# Altium PCB LDCFullN.PcbDoc (part 1 of 2)
Units mm, origin at the board's own origin, x right, y up, seen from the top; angles counter-clockwise.
Board outline 42.47 x 36.98 mm, 4 copper layers (Top Layer, GND, Power, Bottom Layer), stack 1.579 mm thick; 85 components, 54 nets, 294 pads, 82 vias.
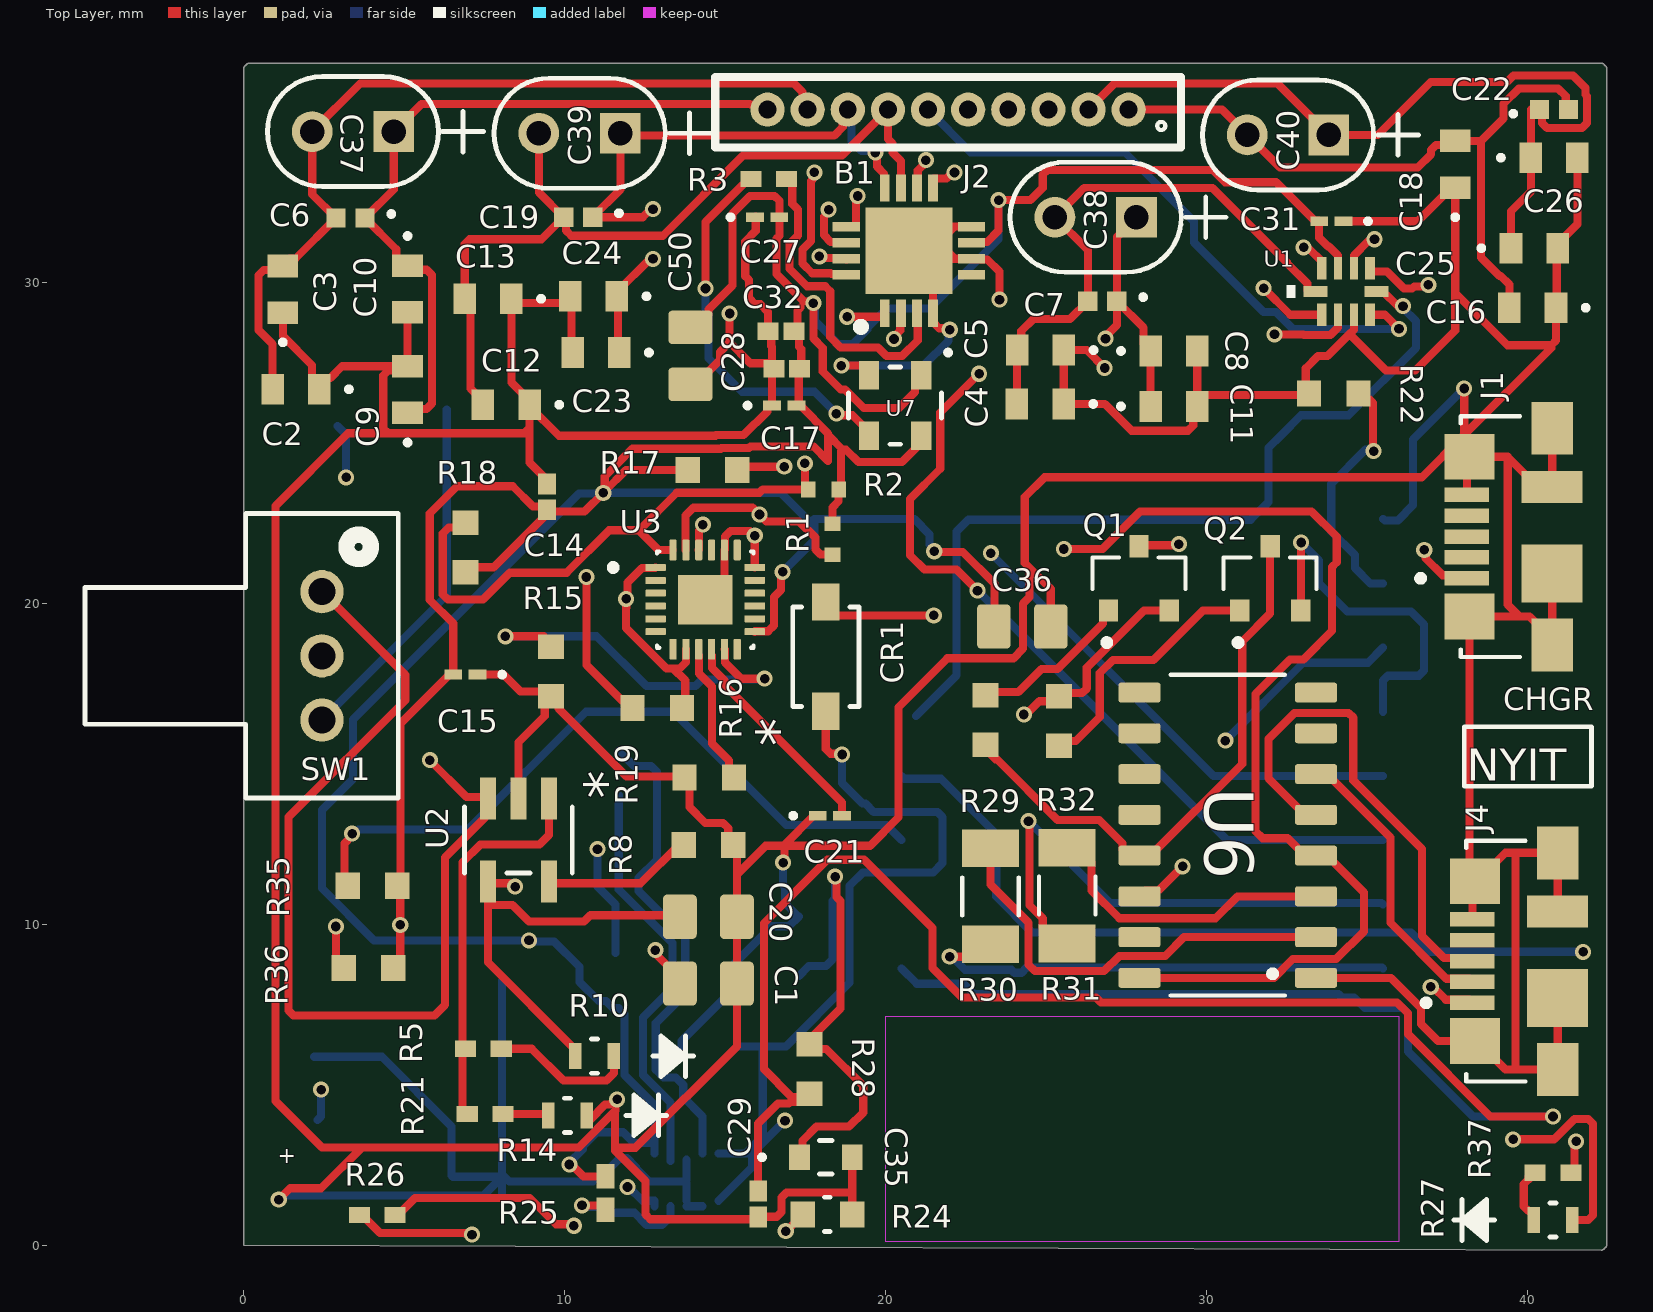
[diagram p0: Top Layer view]
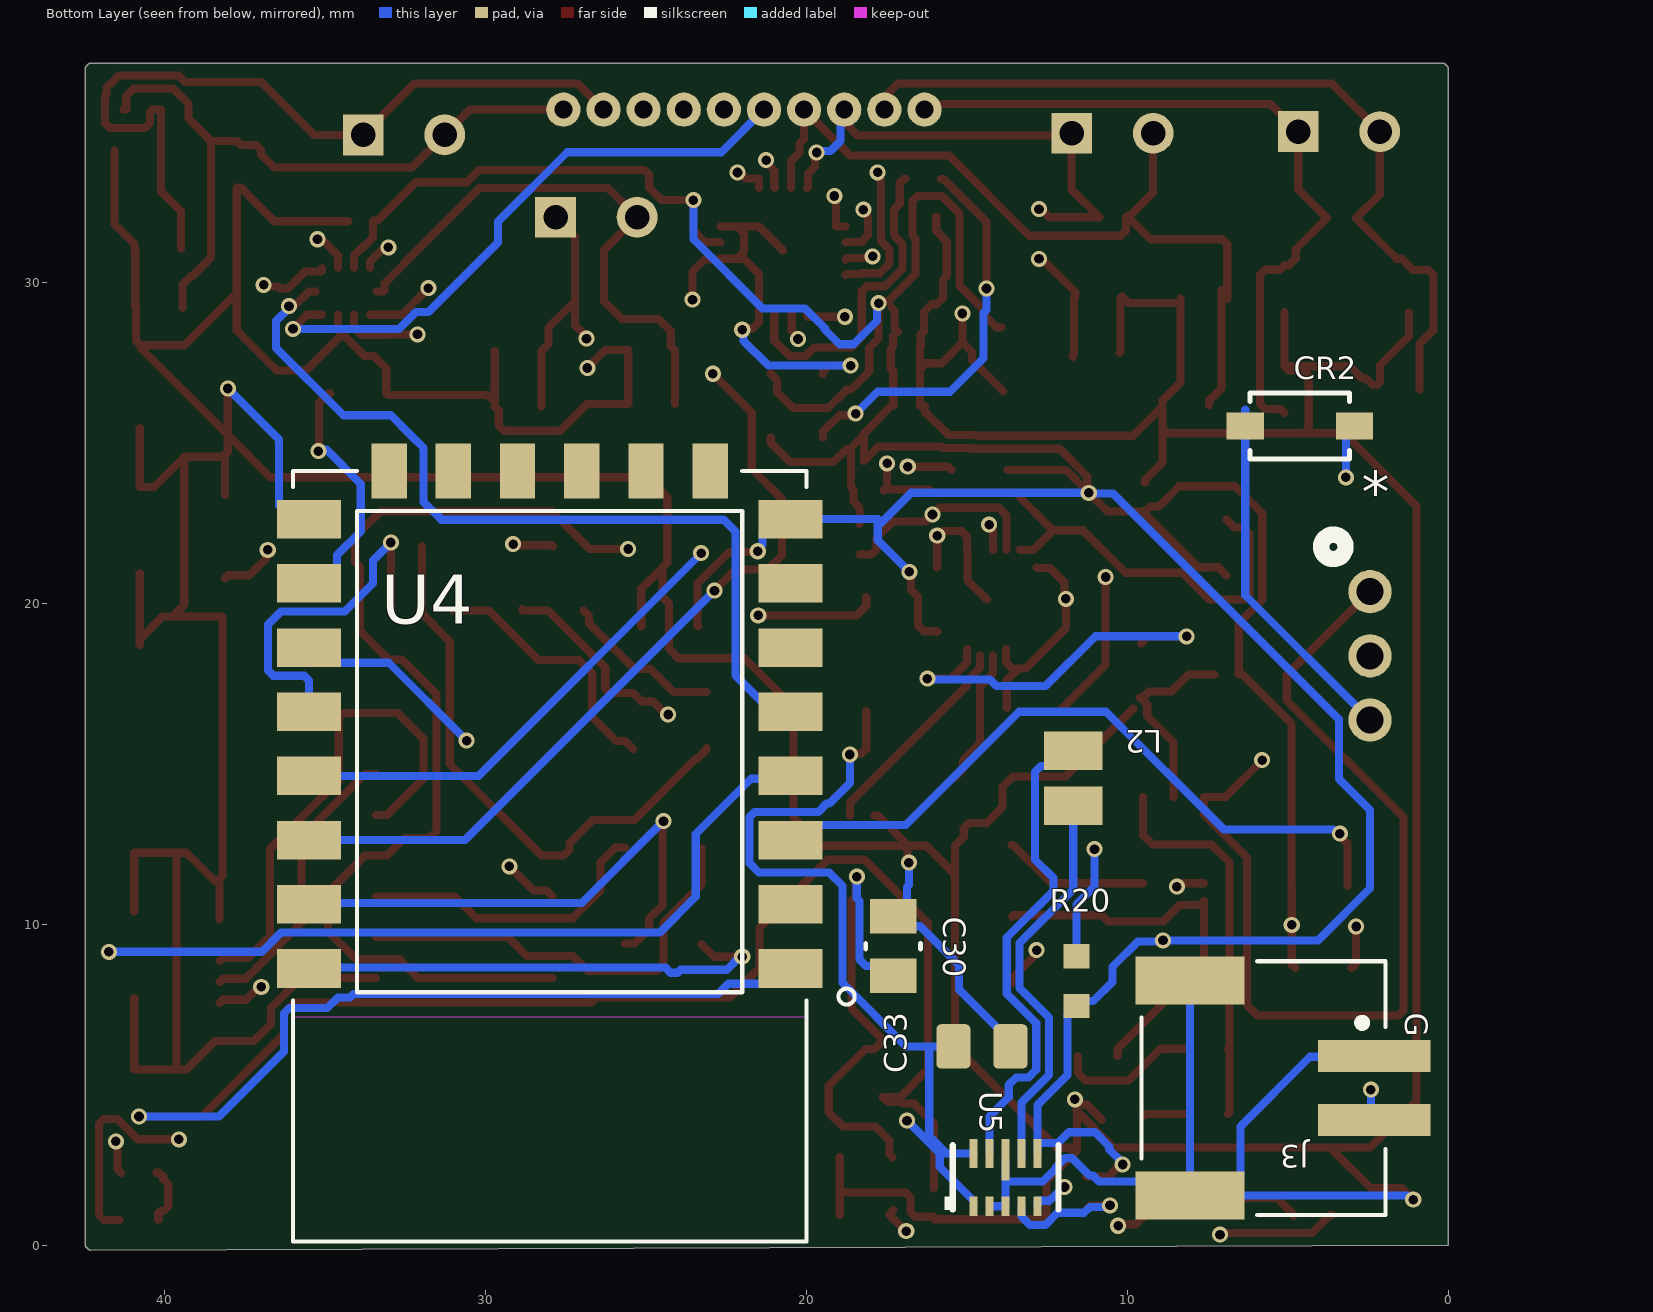
[diagram p1: Bottom Layer view, seen from below]
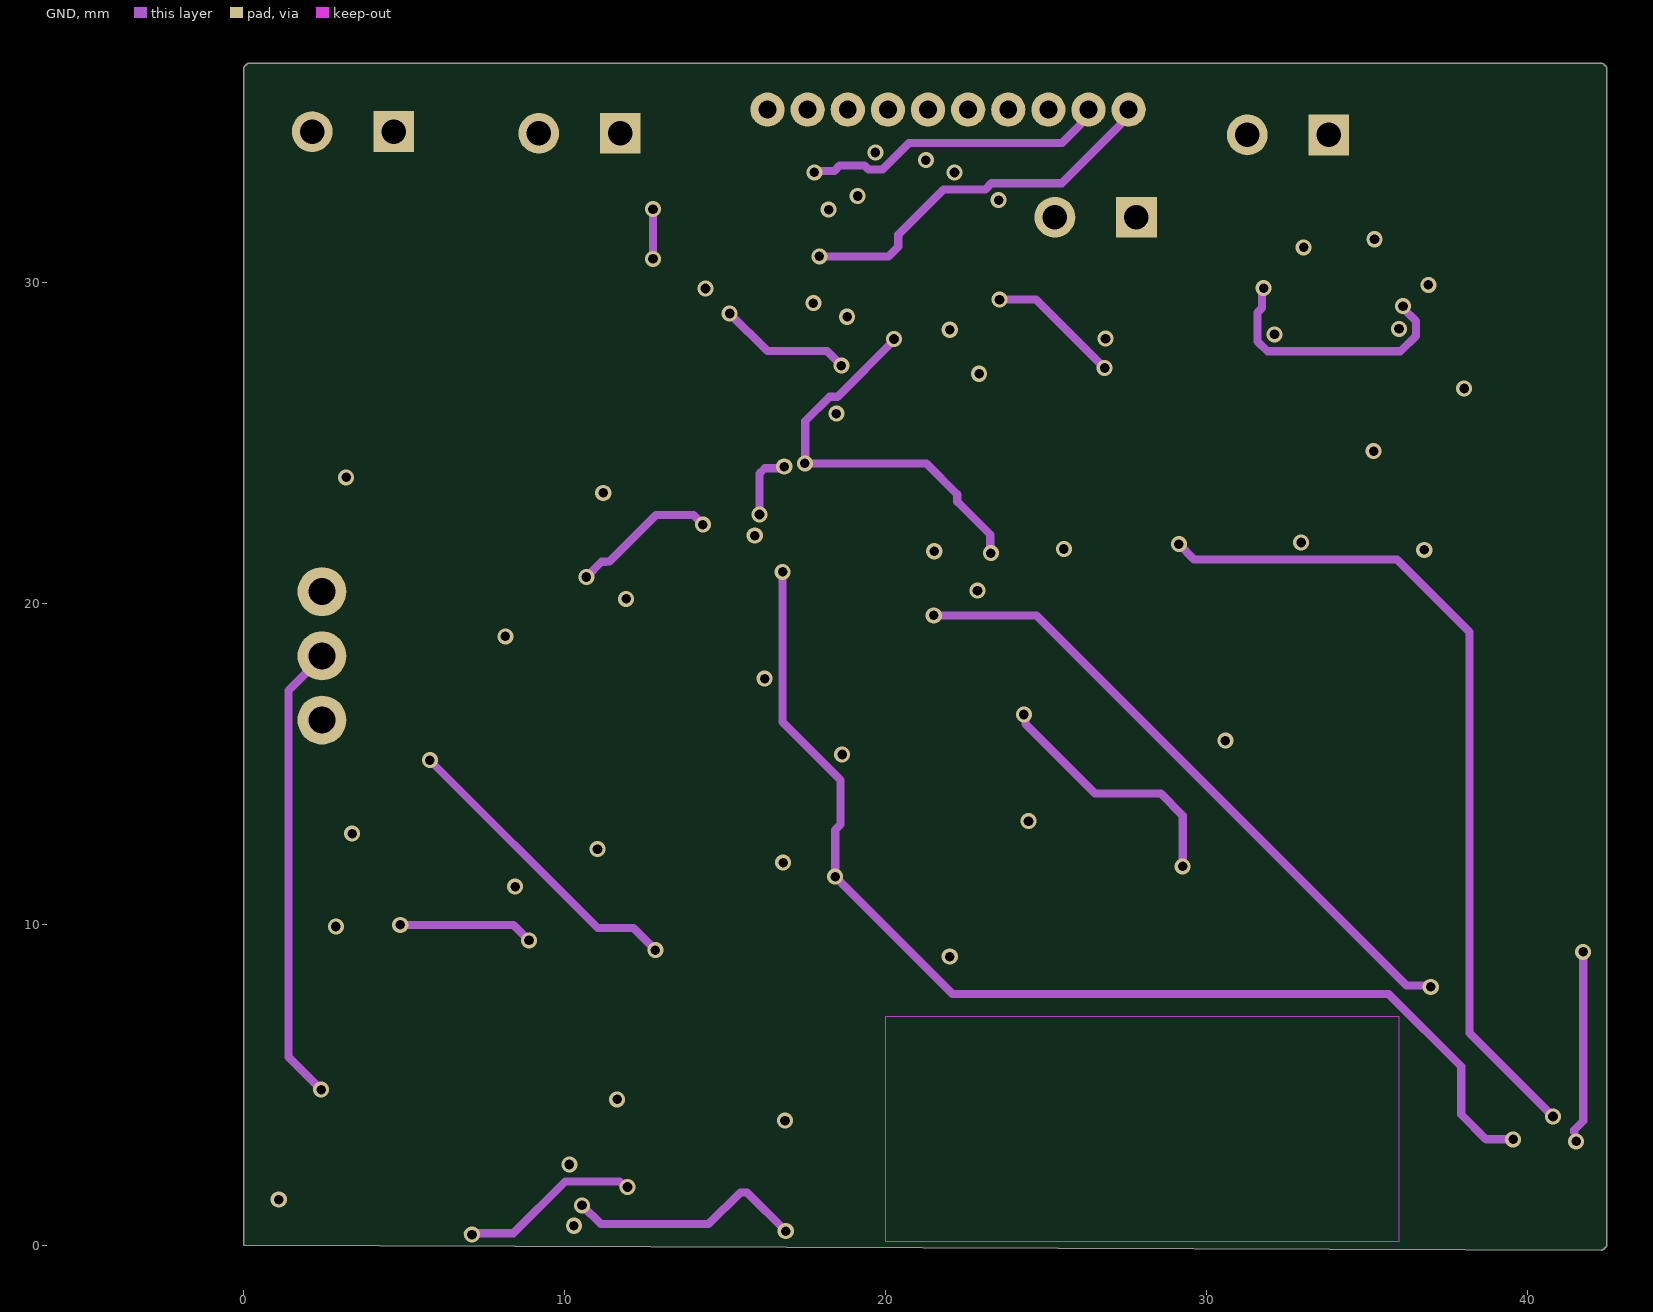
[diagram p2: GND]
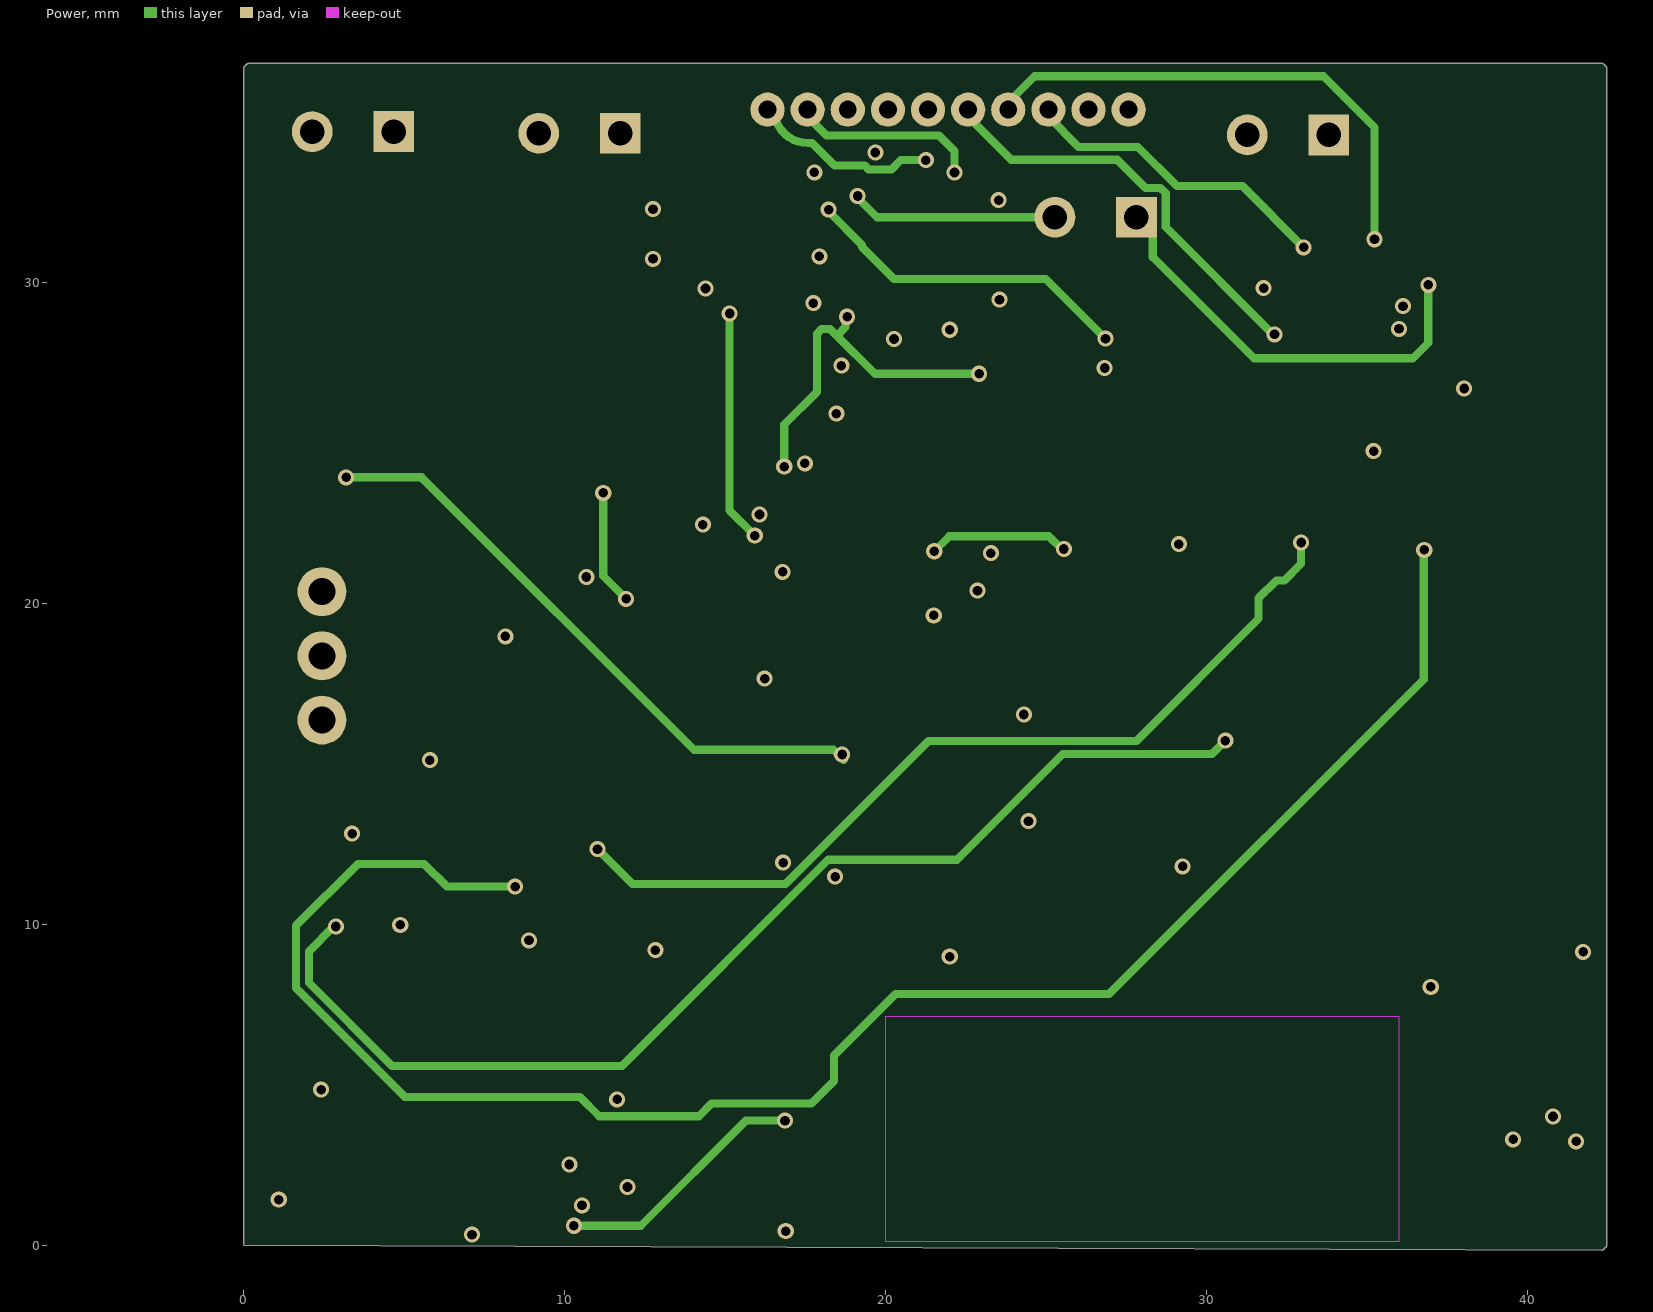
[diagram p3: Power]
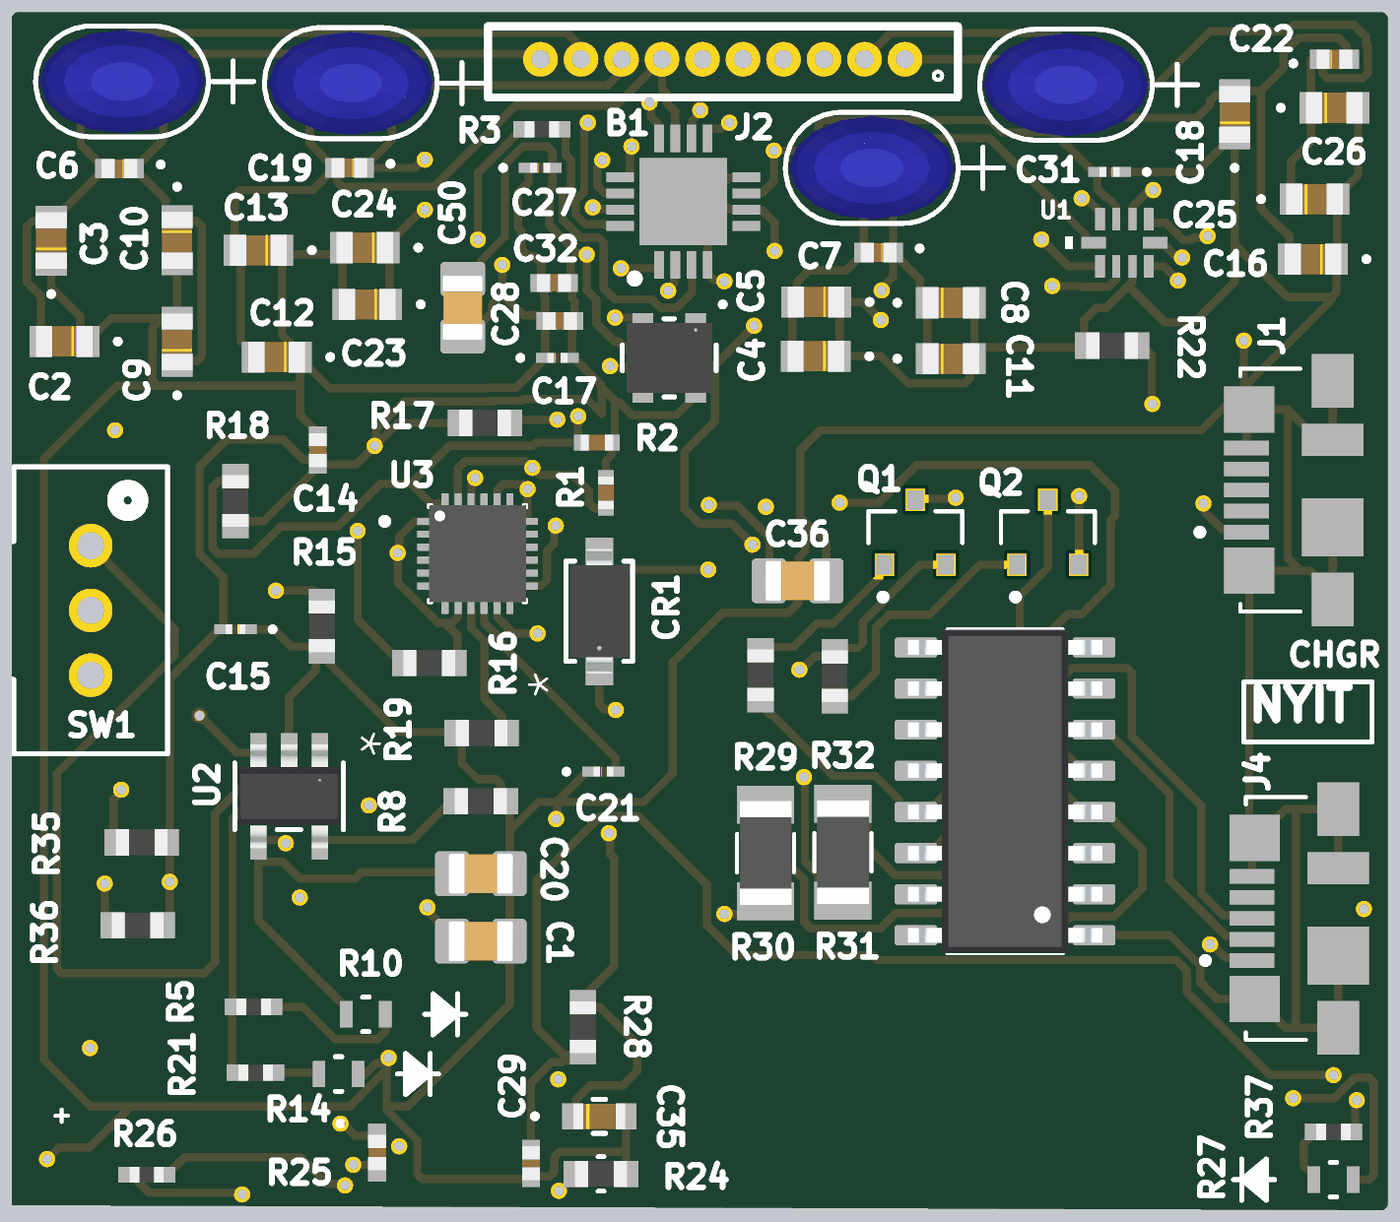
[diagram p5: 3D render of the assembled board from above, using the file's embedded part models]
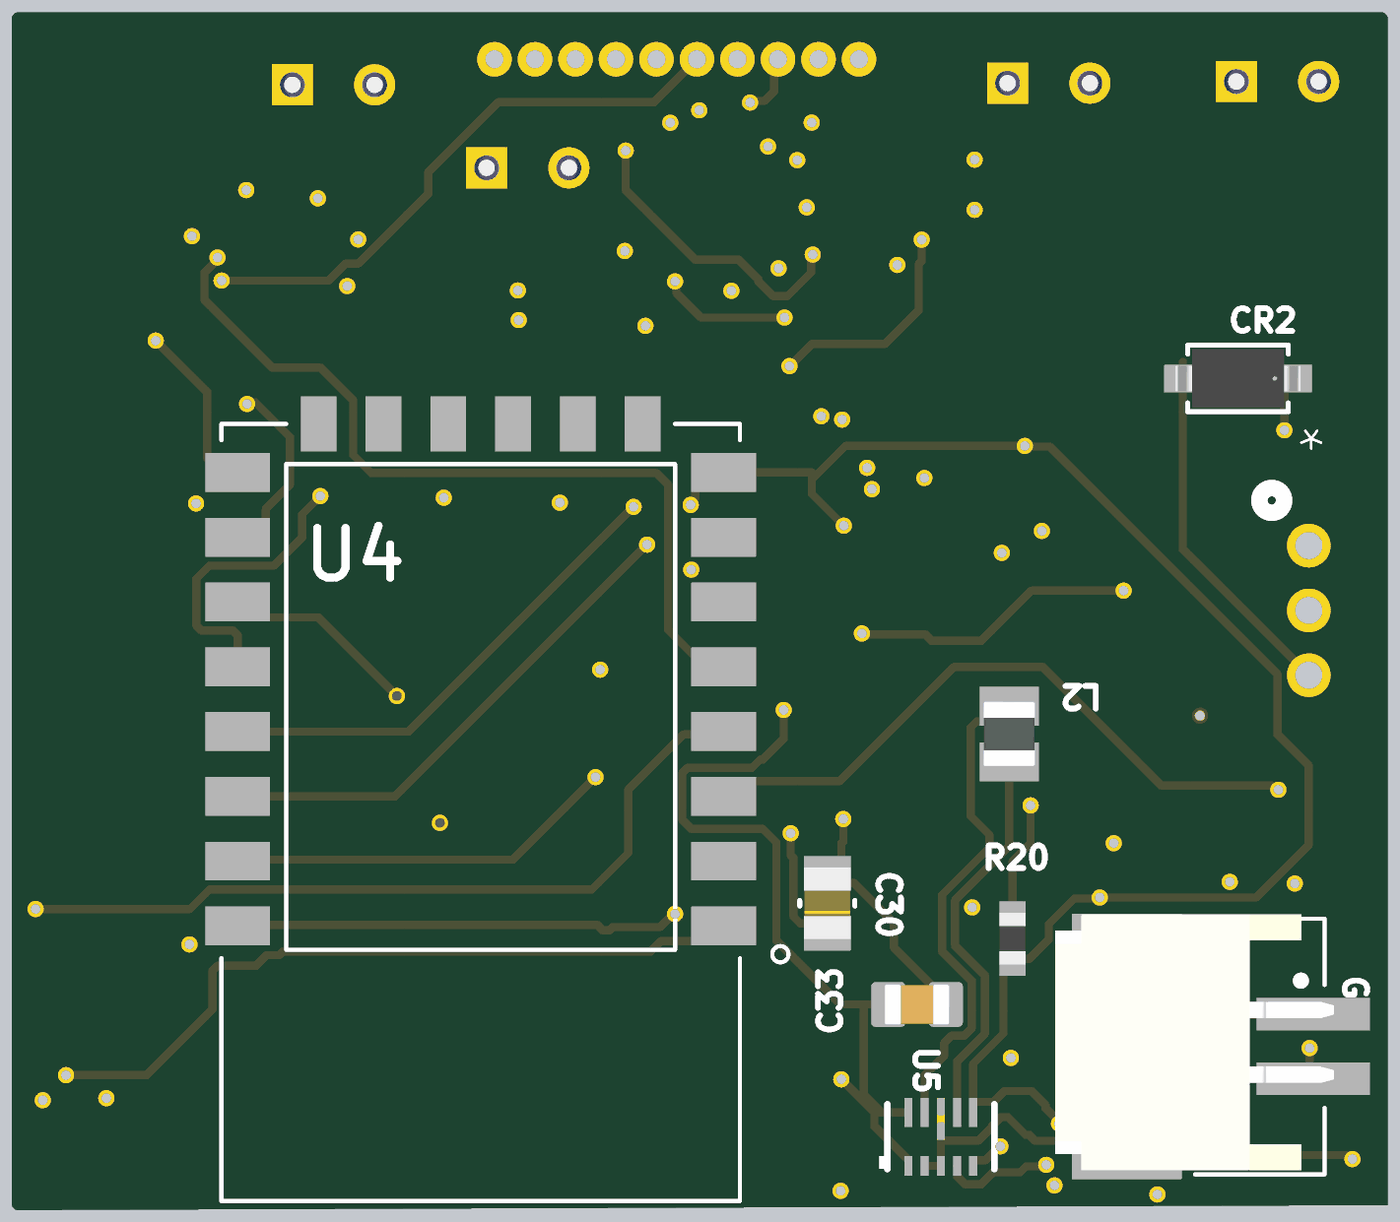
[diagram p6: 3D render of the assembled board from below, using the file's embedded part models]

## Layer stack, top to bottom
Top Solder: solder mask 0.0102, Solder Resist, Dk 3.5
Top Layer: signal copper 0.0356
Dielectric 2: prepreg 0.2, PP-006, Dk 4.1
GND: signal copper 0.035
Dielectric 1: dielectric 1.038, FR-4, Dk 4.8
Power: signal copper 0.035
Dielectric 3: prepreg 0.2, PP-006, Dk 4.1
Bottom Layer: signal copper 0.0356
Bottom Solder: solder mask 0.0102, Solder Resist, Dk 3.5

## Board outline
0,0 0,36.652 cw(c0.127,36.652) 0.066,36.764 cw(c0.178,36.703) 0.178,36.83 42.291,36.83 cw(c42.291,36.703) 42.403,36.764 cw(c42.342,36.652) 42.469,36.652 42.469,0.025 cw(c42.342,0.025) 42.403,-0.086 cw(c42.291,-0.025) 42.291,-0.153

## Design rules (kind name [scope] priority, off if disabled: settings)
BoardOutlineClearance [All] p1: gap=0.254 ignorepadtopadclearanceinfootprint=FALSE except(0: Arc-SplitContinuation Track-SplitContinuation SMDPad-SplitContinuation THPad-SplitContinuation Via-SplitContinuation Fill-SplitContinuation Poly-SplitContinuation Region-SplitContinuation Text-SplitContinuation)
Clearance [All] p1: gap=0.15 ignorepadtopadclearanceinfootprint=TRUE except(0.01: SMDPad-SMDPad)
MinimumSolderMaskSliver [All] p1: minsoldermaskwidth=0.1
PolygonConnect [All] p1: connectstyle=Relief reliefconductorwidth=0.254 reliefentries=4 polygonreliefangle="90 Angle" airgapwidth=0.254
RoutingVias [All] p1: holewidth=0.711 width=1.27 viastyle="Through Hole" minholewidth=0.711 minwidth=1.27 maxholewidth=0.711 maxwidth=1.27
SilkToSilkClearance [All] p1: silktosilkclearance=0.01
SilkToSolderMaskClearance [IsPad] p1: minsilkscreentomaskgap=0.15 clearancetoexposedcopper=TRUE
SolderMaskExpansion [All] p1: expansion=0 istentingtop=FALSE
SupplyNets "Schematic Supply Nets" [InNet('GND')] p1: voltage=0.000
Width [All] p1: maxlimit=0.254 minlimit=0.254 preferedwidth=0.254
27 further rules are at their usual default settings.

## Components (designator, comment, footprint, x,y, rotation, side; value= is the part's Value field where it differs from the comment)
B1 "LDC1614RGHT" "FileName=C:\Users\Zia\OneDrive - The Pennsylvania State University\Desktop\LDCLast\Altium\LDCAltium\QFN50P400X400X80-17N.PcbLib" 20.726,30.988 r90 top
C1 "CL21A106KPFNNNG" "FileName=C:\Users\Zia\OneDrive - The Pennsylvania State University\Desktop\LDCLast\AltiumLib\CL21A106KPFNNNG (10,100U)\CAPC2012X135N.PcbLib" 14.478,8.153 r180 top
C2 "06036A180JAT2A" CAP_06033D104JAT2A 1.626,26.67 r180 top
C3 "06036A180JAT2A" CAP_06033D104JAT2A 1.219,29.784 r90 top
C4 "06036A180JAT2A" CAP_06033D104JAT2A 24.816,26.213 r180 top
C5 "06036A180JAT2A" CAP_06033D104JAT2A 24.826,27.889 r180 top
C6 "0402ZC331KAT2A" CAP_04026Z104KAT2A 3.327,32.004 r180 top
C7 "0402ZC331KAT2A" CAP_04026Z104KAT2A 26.752,29.413 r180 top
C8 "06036A180JAT2A" CAP_06033D104JAT2A 28.981,27.864 r0 top
C9 "06036A180JAT2A" CAP_06033D104JAT2A 5.105,26.66 r90 top
C10 "06036A180JAT2A" CAP_06033D104JAT2A 5.105,29.794 r270 top
C11 "06036A180JAT2A" CAP_06033D104JAT2A 28.981,26.137 r0 top
C12 "06036A180JAT2A" CAP_06033D104JAT2A 8.179,26.187 r180 top
C13 "06036A180JAT2A" CAP_06033D104JAT2A 7.613,29.488 r180 top
C14 "C0402C103K8PACTU" CAPC10555_55N_KEM 9.449,23.317 r270 top
C15 "GRM033R60J104KE19D" G-033_MUR 6.909,17.78 r180 top
C16 "06036A180JAT2A" CAP_06033D104JAT2A 40.157,29.21 r180 top
C17 "GRM033R60J104KE19D" G-033_MUR 16.84,26.162 r0 top
C18 "06036A180JAT2A" CAP_06033D104JAT2A 37.744,33.68 r90 top
C19 "0402ZC331KAT2A" CAP_04026Z104KAT2A 10.42,32.029 r180 top
C20 "CL21A106KPFNNNG" "FileName=C:\Users\Zia\OneDrive - The Pennsylvania State University\Desktop\LDCLast\AltiumLib\CL21A106KPFNNNG (10,100U)\CAPC2012X135N.PcbLib" 14.478,10.236 r180 top
C21 "GRM033R60J104KE19D" G-033_MUR 18.263,13.386 r0 top
C22 "0402ZC331KAT2A" CAP_04026Z104KAT2A 40.823,35.382 r0 top
C23 "06036A180JAT2A" CAP_06033D104JAT2A 10.973,27.813 r180 top
C24 "06036A180JAT2A" CAP_06033D104JAT2A 10.897,29.566 r180 top
C25 "06036A180JAT2A" CAP_06033D104JAT2A 40.208,31.064 r0 top
C26 "06036A180JAT2A" CAP_06033D104JAT2A 40.818,33.884 r0 top
C27 "GRM033R60J104KE19D" G-033_MUR 16.31,32.029 r0 top
C28 "C0402C103K8PACTU" CAPC10555_55N_KEM 16.916,27.305 r0 top
C29 "C0402C471J5GACTU" CAPC10555_55N_KEM 16.027,1.289 r270 top
C30 "GRM21BR60J107ME15L" CAP_GRM21B_MUR 17.297,9.322 r90 bottom
C31 "GRM033R60J104KE19D" G-033_MUR 33.884,31.902 r180 top
C32 "C0402C105K9PACTU" CAPC10555_55N_KEM 16.739,28.473 r0 top
C33 "CL21A106KPFNNNG" "FileName=C:\Users\Zia\OneDrive - The Pennsylvania State University\Desktop\LDCLast\AltiumLib\CL21A106KPFNNNG (10,100U)\CAPC2012X135N.PcbLib" 14.529,6.198 r0 bottom
C35 "CL10A226MP8NUNE" CAP_CL10_SAM 18.136,2.743 r0 top
C36 "CL21A106KPFNNNG" "FileName=C:\Users\Zia\OneDrive - The Pennsylvania State University\Desktop\LDCLast\AltiumLib\CL21A106KPFNNNG (10,100U)\CAPC2012X135N.PcbLib" 24.257,19.279 r0 top
C37 "" FileName=AR205F473K4R:\PCBLib\0.pcblib 4.674,34.696 r180 top
C38 "AR205F473K4R" FileName=AR205F473K4R:\PCBLib\0.pcblib 27.813,32.029 r180 top
C39 "AR205F473K4R" FileName=AR205F473K4R:\PCBLib\0.pcblib 11.735,34.646 r180 top
C40 "AR205F473K4R" FileName=AR205F473K4R:\PCBLib\0.pcblib 33.807,34.595 r180 top
C50 "CL21A106KPFNNNG" CAPC2012X135N 13.919,27.711 r270 top
CR1 "B5819W-TP" SDO_SOD-123_MCC 18.136,18.339 r90 top
CR2 "B5819W-TP" SDO_SOD-123_MCC 4.623,25.527 r0 bottom
J1 "47346-0001" FileName=C:\Users\Public\Documents\Altium\AD26\Library\AltiumLib\USBMicro-47346-0001\MOLEX_47346-0001.PcbLib 40.767,22.08 r90 top
J2 "530481010" CONN10_530481010_MOL 27.57,35.382 r180 top
J3 "S2B-PH-SM4-TB(LF)(SN)" "FileName=C:\Users\Zia\OneDrive - The Pennsylvania State University\Desktop\LDCLast\Altium\S2B-PH-SM4-TB_LF__SN_2pin\JST_S2B-PH-SM4-TB(LF)(SN).PcbLib" 2.302,4.899 r270 bottom
J4 "47346-0001" FileName=C:\Users\Public\Documents\Altium\AD26\Library\AltiumLib\USBMicro-47346-0001\MOLEX_47346-0001.PcbLib 40.938,8.854 r90 top
L2 "DFE201612E-R47M=P2" INDC2016X120N 11.684,14.551 r90 bottom
Q1 "BC817-25" FileName=BC817-25:\PCBLib\0.pcblib 27.889,20.777 r90 top
Q2 "BC817-25" FileName=BC817-25:\PCBLib\0.pcblib 31.979,20.777 r90 top
R1 "RC0402JR-074K7L" RES_0402_YAG 18.339,21.996 r270 top
R2 "RC0402JR-074K7L" RES_0402_YAG 18.059,23.546 r180 top
R3 "RC0402JR-070RL" RC0402N_YAG#1 16.358,33.223 r0 top
R5 "RC0402FR-07470RL" RC0402N_YAG#2 7.468,6.121 r0 top
R8 "RC0603FR-0710KL" RC0603N_YAG#1 14.478,12.471 r180 top
R10 "SML-D12M8WT86" LED_SMLD12_ROM 10.928,5.893 r180 top
R14 "SML-D12M8WT86" LED_SMLD12_ROM 10.086,4.049 r180 top
R15 "RC0603FR-0710KL" RC0603N_YAG#1 9.576,17.873 r90 top
R16 "RC0603FR-0710KL" RC0603N_YAG#1 12.886,16.739 r180 top
R17 "RC0603FR-0710KL" RC0603N_YAG#1 14.605,24.155 r0 top
R18 "RC0603FR-0710KL" RC0603N_YAG#1 6.909,21.742 r90 top
R19 "RC0603FR-0710KL" RC0603N_YAG#1 14.503,14.58 r0 top
R20 "RC0603FR-0710KL" RC0603N_YAG#1 11.582,8.23 r270 bottom
R21 "RC0402FR-07470RL" RC0402N_YAG#2 7.523,4.089 r0 top
R22 "RC0603FR-0710KL" RC0603N_YAG#1 33.96,26.543 r0 top
R24 "RC0603JR-0791KL" RC0603N_YAG#2 18.186,0.965 r180 top
R25 "RMCF0402FT511K" RES_RMCF0402_STP 11.278,1.626 r90 top
R26 "ERJ-2GEJ104X" RC0402N_PAN 4.166,0.94 r180 top
R27 "SML-D12M8WT86" LED_SMLD12_ROM 40.792,0.787 r0 top
R28 "RC0603FR-0710KL" RC0603N_YAG#1 17.628,5.495 r270 top
R29 "RC0603FR-0710KL" RC0603N_YAG#1 23.114,16.366 r90 top
R30 "CR1206-FX-4700ELF" FileName=CR1206-FX-4700ELF:\PCBLib\0.pcblib 23.266,10.871 r90 top
R31 "CR1206-FX-4700ELF" FileName=CR1206-FX-4700ELF:\PCBLib\0.pcblib 25.654,10.897 r90 top
R32 "RC0603FR-0710KL" RC0603N_YAG#1 25.4,16.332 r270 top
R35 "RC0603FR-0710KL" RC0603N_YAG#1 4.013,11.201 r180 top
R36 "RC0603FR-0710KL" RC0603N_YAG#1 3.886,8.636 r180 top
R37 "RC0402FR-07470RL" RC0402N_YAG#1 40.792,2.261 r0 top
SW1 "SLW-864574-5A-RA-N-D" SLW-864574-5A-RA-N-D_SSD 2.438,20.364 r270 top
U1 "TS5A23157RSER" "FileName=C:\Users\Zia\OneDrive - The Pennsylvania State University\Desktop\LDCLast\AltiumLib\TS5A23157RSER\TS5A23157RSER.PcbLib" 34.341,29.718 r90 top
U2 "MCP73831T-2ACI/OT" SOT-23-5_MC_MCH 8.56,12.624 r270 top
U3 "MPU-9250" FileName=C:\Users\Public\Documents\Altium\AD26\Library\AltiumLib\MPU-9250\QFN40P300X300X105-25N.PcbLib 14.376,20.117 r0 top
U4 "ESP8266-12E/ESP-12E" "FileName=C:\Users\Zia\OneDrive - The Pennsylvania State University\Desktop\LDCLast\Altium\ESP8266-12E_ESP-12E (1)\XCVR_ESP8266-12E_ESP-12E.PcbLib" 27.996,15.623 r0 bottom
U5 "TPS63802DLAR" FileName=TPS63802DLAR:\PCBLib\0.pcblib 13.794,2.115 r90 bottom
U6 "CH340C" SOIC127P600X180-16N 30.658,12.776 r180 top
U7 "625L3C040M00000" IC_625L3C040M00000_CTS 20.295,26.162 r270 top

## Footprints (in the part's own frame and the unit in brackets; to place one, negate y for a bottom-side part, rotate by r counter-clockwise, add the part's x,y. Pads: shape width x height; smd on the part's side, far side on the other; paste and mask are expansions set on the pad)
CAP_04026Z104KAT2A [mm]
  rect 0.603x0.6 smd paste+0 mask+0: 1(-0.452,0) 2(0.452,0)
  silkscreen extent -1.35,-0.2 -1.19,-0.05, body extent -0.55,-0.3 0.55,0.3, height 0.56
CAP_06033D104JAT2A [mm]
  rect 0.703x0.96 smd paste+0 mask+0: 1(-0.727,0) 2(0.727,0)
  silkscreen extent -1.73,-0.08 -1.58,0.08, body extent -0.87,-0.48 0.87,0.48, height 0.9
CAP_CL10_SAM [mm]
  rect 0.65x0.8 smd paste+0 mask+0: 1(-0.825,0) 2(0.825,0)
  silkscreen extent -2.06,-0.53 0.19,0.53, body extent -0.8,-0.4 0.8,0.4, height 0.9
CAP_GRM21B_MUR [mil]
  rect 42x57 smd paste+0 mask+0: 1(-36.5,0) 2(36.5,0)
  silkscreen extent -3,-34 3,34, body extent -44,-29 44,29, height 57
CAPC2012X135N [mm]
  rrect25% 1.05x1.38 smd: 1(-0.888,0) 2(0.888,0)
  body extent -1,-0.63 1,0.63, height 1.35
CAPC10555_55N_KEM [mm]
  rect 0.653x0.55 smd paste+0 mask+0: 1(-0.402,0) 2(0.402,0)
  body extent -0.53,-0.28 0.53,0.28, height 0.55
CONN10_530481010_MOL [mil]
  round 42 hole 22 paste-99999 mask+0: 1(0,0) 2(49.21,0) 3(98.43,0) 4(147.64,0) 5(196.85,0) 6(246.06,0) 7(295.28,0) 8(344.49,0) 9(393.7,0) 10(442.91,0)
  silkscreen extent -64,-40 507,46
FileName=AR205F473K4R:\PCBLib\0.pcblib [mil]
  rect 50x50 hole 30 paste-99999 mask+0: 1(0,0)
  round 50 hole 30 paste-99999 mask+0: 2(100,0)
  silkscreen extent -110,-68 155,68, body extent -50,-63 150,63, height 200
FileName=BC817-25:\PCBLib\0.pcblib [mm]
  rect 0.7x0.6 smd paste-0.05 mask+0.102: 1(-1,0.95) 2(-1,-0.95) 3(1,0)
  silkscreen extent -2.1,-1.45 0.65,1.45
FileName=C:\Users\Public\Documents\Altium\AD26\Library\AltiumLib\MPU-9250\QFN40P300X300X105-25N.PcbLib [mm]
  rrect25% 0.64x0.22 smd: 1(-1.545,1) 2(-1.545,0.6) 3(-1.545,0.2) 4(-1.545,-0.2) 5(-1.545,-0.6) 6(-1.545,-1) 13(1.545,-1) 14(1.545,-0.6) 15(1.545,-0.2) 16(1.545,0.2) 17(1.545,0.6) 18(1.545,1)
  rrect25% 0.22x0.64 smd: 7(-1,-1.545) 8(-0.6,-1.545) 9(-0.2,-1.545) 10(0.2,-1.545) 11(0.6,-1.545) 12(1,-1.545) 19(1,1.545) 20(0.6,1.545) 21(0.2,1.545) 22(-0.2,1.545) 23(-0.6,1.545) 24(-1,1.545)
  rect 1.7x1.54 smd paste-2: 25(0,0)
  silkscreen extent -2.96,-1.5 1.5,1.5, body extent -1.5,-1.5 1.5,1.5, height 1.05
FileName=C:\Users\Public\Documents\Altium\AD26\Library\AltiumLib\USBMicro-47346-0001\MOLEX_47346-0001.PcbLib [mm]
  rect 0.45x1.38 smd: 1(-1.3,2.66) 2(-0.65,2.66) 3(0,2.66) 4(0.65,2.66) 5(1.3,2.66)
  rect 1.425x1.55 smd: S1(-2.488,2.575) S2(2.487,2.575)
  rect 1.65x1.3 smd: S3(-3.375,0) S6(3.375,0)
  rect 1.8x1.9 smd: S4(-1.15,0)
  rect 1x1.9 smd: S5(1.55,0)
  silkscreen extent -3.75,1 3.75,4.2
"FileName=C:\Users\Zia\OneDrive - The Pennsylvania State University\Desktop\LDCLast\Altium\ESP8266-12E_ESP-12E (1)\XCVR_ESP8266-12E_ESP-12E.PcbLib" [mm]
  rect 2x1.2 smd: 1(-7.5,7) 2(-7.5,5) 3(-7.5,3) 4(-7.5,1) 5(-7.5,-1) 6(-7.5,-3) 7(-7.5,-5) 8(-7.5,-7) 15(7.5,-7) 16(7.5,-5) 17(7.5,-3) 18(7.5,-1) 19(7.5,1) 20(7.5,3) 21(7.5,5) 22(7.5,7)
  rect 1.1x1.7 smd: 9(-5,-8.5) 10(-3,-8.5) 11(-1,-8.5) 12(1,-8.5) 13(3,-8.5) 14(5,-8.5)
  Keep-Out Layer region: 8,8.51 -8.009,8.51 -8.009,15.5 8,15.5
  Keep-Out Layer region: 8,8.51 -8.009,8.51 -8.009,15.5 8,15.5
  silkscreen extent -9.5,-8.5 8,15.5
"FileName=C:\Users\Zia\OneDrive - The Pennsylvania State University\Desktop\LDCLast\Altium\LDCAltium\QFN50P400X400X80-17N.PcbLib" [mm]
  rect 0.85x0.3 smd: 1(-1.95,0.75) 2(-1.95,0.25) 3(-1.95,-0.25) 4(-1.95,-0.75) 9(1.95,-0.75) 10(1.95,-0.25) 11(1.95,0.25) 12(1.95,0.75)
  rect 0.3x0.85 smd: 5(-0.75,-1.95) 6(-0.25,-1.95) 7(0.25,-1.95) 8(0.75,-1.95) 13(0.75,1.95) 14(0.25,1.95) 15(-0.25,1.95) 16(-0.75,1.95)
  rect 2.7x2.7 smd: 17(0,0)
  silkscreen extent -2.5,1.37 -2.25,1.62
"FileName=C:\Users\Zia\OneDrive - The Pennsylvania State University\Desktop\LDCLast\Altium\S2B-PH-SM4-TB_LF__SN_2pin\JST_S2B-PH-SM4-TB(LF)(SN).PcbLib" [mm]
  rect 1x3.5 smd: 1(-1,0) 2(1,0)
  rect 1.5x3.4 smd: S1(-3.35,-5.75) S2(3.35,-5.75)
  silkscreen extent -3.95,-7.25 3.95,0.35, body extent -4.08,-7.97 3.82,0.64, height 5.5
"FileName=C:\Users\Zia\OneDrive - The Pennsylvania State University\Desktop\LDCLast\AltiumLib\CL21A106KPFNNNG (10,100U)\CAPC2012X135N.PcbLib" [mm]
  rrect25% 1.05x1.38 smd: 1(-0.888,0) 2(0.888,0)
  body extent -1,-0.63 1,0.63, height 1.35
"FileName=C:\Users\Zia\OneDrive - The Pennsylvania State University\Desktop\LDCLast\AltiumLib\TS5A23157RSER\TS5A23157RSER.PcbLib" [mm]
  rect 0.705x0.3 smd: 1(-0.727,0.75) 4(-0.727,-0.75) 6(0.727,-0.75) 9(0.727,0.75)
  rect 0.705x0.25 smd: 2(-0.727,0.25) 3(-0.727,-0.25) 7(0.727,-0.25) 8(0.727,0.25)
  rect 0.35x0.755 smd: 5(0,-0.952) 10(0,0.952)
  silkscreen extent -0.19,1.58 0.19,1.84
FileName=CR1206-FX-4700ELF:\PCBLib\0.pcblib [mm]
  rect 1.17x1.77 smd: 1(-1.494,0) 2(1.494,0)
  silkscreen extent -0.59,-0.88 0.59,0.88, body extent -1.6,-0.8 1.6,0.8, height 0.75
FileName=TPS63802DLAR:\PCBLib\0.pcblib [mm]
  rect 0.6x0.25 smd paste+0 mask+0: 1(-0.9,1) 2(-0.9,0.5) 3(-0.9,0) 4(-0.9,-0.5) 5(-0.9,-1)
  rect 0.9x0.25 smd paste+0 mask+0: 6(0.75,-1) 7(0.75,-0.5) 9(0.75,0.5) 10(0.75,1)
  rect 1.3x0.25 smd paste-0.637 mask+0: 8(0.55,0)
  silkscreen extent -1,-1.65 1,1.9
G-033_MUR [mil]
  rect 21.78x12 smd paste+0 mask+0: 1(-14.89,0) 2(14.89,0)
  silkscreen extent -48,-3 -42,3, body extent -12,-6 12,6, height 13
IC_625L3C040M00000_CTS [mil]
  rect 35x25 smd paste+0 mask+0: 1(-37,31.99) 2(-37,-31.99) 3(37,-31.99) 4(37,31.99)
  silkscreen extent -68,-57 48,68, body extent -43,-52 43,52, height 39
INDC2016X120N [mm]
  rect 1.2x1.82 smd: 1(-0.86,0) 2(0.86,0)
  body extent -1,-0.8 1,0.8, height 1.2
LED_SMLD12_ROM [mil]
  rect 15.5x32 smd: 1(-23.75,0) 2(23.75,0)
  silkscreen extent -122,-25 4,25
RC0402N_PAN [mm]
  rect 0.656x0.5 smd paste+0 mask+0: 1(-0.553,0) 2(0.553,0)
  body extent -0.53,-0.25 0.53,0.25, height 0.71
RC0402N_YAG#1 [mil]
  rect 25.78x20 smd paste+0 mask+0: 1(-21.89,0) 2(21.89,0)
  body extent -21,-10 21,10, height 28
RC0402N_YAG#2 [mil]
  rect 26x20 smd paste+0 mask+0: 1(-22,0) 2(22,0)
  body extent -21,-10 21,10, height 28
RC0603N_YAG#1 [mil]
  rect 29.78x32 smd paste+0 mask+0: 1(-30.39,0) 2(30.39,0)
  body extent -31,-16 31,16, height 28
RC0603N_YAG#2 [mil]
  rect 30x32 smd paste+0 mask+0: 1(-30.5,0) 2(30.5,0)
  silkscreen extent -3,-21 3,21, body extent -31,-16 31,16, height 28
RES_0402_YAG [mm]
  rect 0.453x0.5 smd paste+0 mask+0: 1(-0.477,0) 2(0.477,0)
  body extent -0.5,-0.25 0.5,0.25, height 0.35
RES_RMCF0402_STP [mil]
  rect 30x22 smd paste+0 mask+0: 1(-20.5,0) 2(20.5,0)
  body extent -21,-11 21,11, height 14
SDO_SOD-123_MCC [mil]
  rect 45.56x33.36 smd paste+0 mask+0: 1(-67,0) 2(67,0)
  silkscreen extent -61,-41 61,41, body extent -76,-36 76,36, height 59
SLW-864574-5A-RA-N-D_SSD [mil]
  round 53 / inner round 60 / far side round 53 hole 33 paste-99999 mask+0: 1(0,0) 2(78.74,0) 3(157.48,0)
  silkscreen extent -96,-290 253,94
SOIC127P600X180-16N [mm]
  rrect25% 1.31x0.62 smd: 1(-2.75,4.445) 2(-2.75,3.175) 3(-2.75,1.905) 4(-2.75,0.635) 5(-2.75,-0.635) 6(-2.75,-1.905) 7(-2.75,-3.175) 8(-2.75,-4.445) 9(2.75,-4.445) 10(2.75,-3.175) 11(2.75,-1.905) 12(2.75,-0.635) 13(2.75,0.635) 14(2.75,1.905) 15(2.75,3.175) 16(2.75,4.445)
  silkscreen extent -1.78,-5 1.78,5, body extent -3,-5 3,5, height 1.8
SOT-23-5_MC_MCH [mil]
  rect 51.56x20 smd paste+0 mask+0: 1(-51,37.4) 2(-51,0) 3(-51,-37.4) 4(51,-37.4) 5(51,37.4)
  silkscreen extent -41,-66 41,66, body extent -63,-61 63,61, height 57

## Part data
B1: "4-channel, 28-bit Inductance-to-Digital Converter with I2C for Inductive Sensing", Manufacturer_Name="Texas Instruments", Datasheet Link=http://www.ti.com/lit/ds/symlink/ldc1614.pdf, Geometry.Height=0.8mm, Manufacturer_Part_Number=LDC1614RGHT
C1 C20 C33 C36 C50: "CL21 Series 10 uF 10 V Â±10 % Tol. X5R SMT Multilayer Ceramic Capacitor", Package="SMD-2 Samsung", Check_prices=https://www.snapeda.com/parts/CL21A106KPFNNNG/Samsung/view-part/?ref=eda, MF="Samsung Electro-Mechanics", MP=CL21A106KPFNNNG, SnapEDA_Link=https://www.snapeda.com/parts/CL21A106KPFNNNG/Samsung/view-part/?ref=snap
C2: "18pF", Manufacturer_Name="KYOCERA AVX", Copyright="Copyright (C) 2026 Ultra Librarian. All rights reserved.", Manufacturer_Part_Number=06036A180JAT2A
C3 C4 C5 C8 C9 C10 C11 C12 C13 C16 C18 C23 C24 C25 C26: "Description", Manufacturer_Name="KYOCERA AVX", Copyright="Copyright (C) 2026 Ultra Librarian. All rights reserved.", Manufacturer_Part_Number=06036A180JAT2A
C6 C7 C19 C22 C38 C39 C40: "No Description Available", Manufacturer_Name="KYOCERA AVX", Copyright="Copyright (C) 2026 Ultra Librarian. All rights reserved."
  C6 C7 C19 C22: Manufacturer_Part_Number=0402ZC331KAT2A
  C38 C39 C40: Manufacturer_Part_Number=AR205F473K4R
C14 C28: "SMD Comm X5R, Ceramic, 0.01 uF, 10%, 10 VDC, X5R, SMD, MLCC, Temperature Stable, Class II, 0402", Manufacturer_Name=Kemet, Copyright="Copyright (C) 2026 Ultra Librarian. All rights reserved.", Datasheet=https://content.kemet.com/datasheets/KEM_C1006_X5R_SMD.pdf, Manufacturer_Part_Number=C0402C103K8PACTU
C15 C17 C21 C27 C31: "Description", Manufacturer_Name=Murata, Copyright="Copyright (C) 2025 Ultra Librarian. All rights reserved.", Manufacturer_Part_Number=GRM033R60J104KE19D
C29: "SMD Comm C0G, Ceramic, 470 pF, 5%, 50 VDC, C0G, SMD, MLCC, Ultra-Stable, Low Loss, Class I, 0402", Manufacturer_Name=Kemet, Copyright="Copyright (C) 2025 Ultra Librarian. All rights reserved.", Manufacturer_Part_Number=C0402C471J5GACTU
C30: "CAP CER 100UF 6.3V X5R 0805", Manufacturer_Name=Murata, Copyright="Copyright (C) 2025 Ultra Librarian. All rights reserved.", Manufacturer_Part_Number=GRM21BR60J107ME15L
C32: "SMD Comm X5R, Ceramic, 1 uF, 10%, 6.3 VDC, X5R, SMD, MLCC, Temperature Stable, Class II, 0402", Manufacturer_Name=Kemet, Copyright="Copyright (C) 2025 Ultra Librarian. All rights reserved.", Manufacturer_Part_Number=C0402C105K9PACTU
C35: "Description", Manufacturer_Name=Samsung, Copyright="Copyright (C) 2025 Ultra Librarian. All rights reserved.", Manufacturer_Part_Number=CL10A226MP8NUNE
C37: library part AR205F473K4R, "No Description Available", Manufacturer_Name="KYOCERA AVX", Copyright="Copyright (C) 2026 Ultra Librarian. All rights reserved.", Manufacturer_Part_Number=AR205F473K4R
CR1 CR2: "Description", Manufacturer_Name=MCC, Copyright="Copyright (C) 2025 Ultra Librarian. All rights reserved.", Manufacturer_Part_Number=B5819W-TP
J1 J4: "Conn Data USB Micro B w/Flange SMT Bottom Mnt LF", Package=None, Check_prices=https://www.snapeda.com/parts/47346-0001/Molex/view-part/?ref=eda, MF=Molex, MP=47346-0001, SnapEDA_Link=https://www.snapeda.com/parts/47346-0001/Molex/view-part/?ref=snap
J2: "1.25mm Pitch, PicoBlade PCB Header, Single Row, Right-Angle, Through Hole, Tin (Sn) Plating, Friction Lock,  10 Circuits, Tray, 2.30mm PC Tail Length", Manufacturer_Name="Molex Connector Corporation", Copyright="Copyright (C) 2025 Ultra Librarian. All rights reserved.", Manufacturer_Part_Number=530481010, RefDes=RefDes, Type=Type
J3: "Connector Header Surface Mount, Right Angle 2 position 0.079 (2.00mm)", Package=None, Check_prices=https://www.snapeda.com/parts/S2B-PH-SM4-TB(LF)(SN)/JST+Sales+America+Inc./view-part/?ref=eda, Digi-Key_Part_Number=455-1749-2-ND, MF="JST Sales", MP=S2B-PH-SM4-TB(LF)(SN), Purchase-URL=https://pricing.snapeda.com/search/part/S2B-PH-SM4-TB(LF)(SN)/?ref=eda, SnapEDA_Link=https://www.snapeda.com/parts/S2B-PH-SM4-TB(LF)(SN)/JST+Sales+America+Inc./view-part/?ref=snap
L2: "Inductor with Inductance: 0.47uH Tol. +/-20%, Package: 0806 (2016)", Package="2016 Murata", Check_prices=https://www.snapeda.com/parts/DFE201612E-R47M=P2/Murata/view-part/?ref=eda, Digi-Key_Part_Number=490-DFE201612E-R47M=P2TR-ND, MF=Murata, MP=DFE201612E-R47M=P2, Purchase-URL=https://pricing.snapeda.com/search/part/DFE201612E-R47M=P2/?ref=eda, SnapEDA_Link=https://www.snapeda.com/parts/DFE201612E-R47M=P2/Murata/view-part/?ref=snap
Q1 Q2: "Bipolar (BJT) Transistor NPN 45 V 500 mA 100MHz 900 mW Surface Mount DFN1010D-3", Package="SOT-23-3 Nexperia USA", Check_prices=https://www.snapeda.com/parts/BC817-25/Nexperia/view-part/?ref=eda, MF="Nexperia USA", MP=BC817-25, SnapEDA_Link=https://www.snapeda.com/parts/BC817-25/Nexperia/view-part/?ref=snap
R1 R2 R24: "No Description Available", Manufacturer_Name=Yageo, Copyright="Copyright (C) 2026 Ultra Librarian. All rights reserved."
  R1 R2: Manufacturer_Part_Number=RC0402JR-074K7L
  R24: Manufacturer_Part_Number=RC0603JR-0791KL
R3: "RES; SMT (0402); 0; 5%; JUMPER; 0.0630W", Manufacturer_Name=Yageo, Copyright="Copyright (C) 2025 Ultra Librarian. All rights reserved.", Manufacturer_Part_Number=RC0402JR-070RL
R5 R21 R37: "Description", Manufacturer_Name=Yageo, Copyright="Copyright (C) 2025 Ultra Librarian. All rights reserved.", Manufacturer_Part_Number=RC0402FR-07470RL
R8 R15 R16 R17 R18 R19 R20 R22 R28 R29 R32 R35 R36: "RES SMD 10kO 1% 1/10W 0603", Manufacturer_Name=Yageo, Copyright="Copyright (C) 2025 Ultra Librarian. All rights reserved.", Manufacturer_Part_Number=RC0603FR-0710KL
R10 R14 R27: "Description", Manufacturer_Name="ROHM Semiconductor", Copyright="Copyright (C) 2026 Ultra Librarian. All rights reserved.", Manufacturer_Part_Number=SML-D12M8WT86
R25: "No Description Available", Manufacturer_Name="Stackpole International", Copyright="Copyright (C) 2026 Ultra Librarian. All rights reserved.", Manufacturer_Part_Number=RMCF0402FT511K
R26: "RESISTOR; 0402; 100K OHM; 5%; 200PPM; 0.10W; THICK FILM", Manufacturer_Name=Panasonic, Copyright="Copyright (C) 2025 Ultra Librarian. All rights reserved.", Manufacturer_Part_Number=ERJ-2GEJ104X
R30 R31: "RESISTOR THICK FILM, 470 OHM, 1%, 1206; Product Range:BOURNS - CR Series; Resistance:470ohm; Power Rating:250mW; Resistance Tolerance:Â± 1%; Resistor Case Style:1206 [3216 Metric]; Resistor Element Material:Thick Film; Temperature Coefficient:Â± 100ppm/Â°", Package="3216 Bourns", Check_prices=https://www.snapeda.com/parts/CR1206-FX-4700ELF/Bourns/view-part/?ref=eda, MF=Bourns, MP=CR1206-FX-4700ELF, SnapEDA_Link=https://www.snapeda.com/parts/CR1206-FX-4700ELF/Bourns/view-part/?ref=snap
SW1: "Description", Manufacturer_Name="Same Sky", Copyright="Copyright (C) 2025 Ultra Librarian. All rights reserved.", Manufacturer_Part_Number=SLW-864574-5A-RA-N-D, RefDes=RefDes, Type=Type
U1: "5V, 2:1 (SPDT), 2-channel, analog switch 10-UQFN -40 to 125", Manufacturer_Name="Texas Instruments", Copyright="Copyright (C) 2026 Ultra Librarian. All rights reserved.", Manufacturer_Part_Number=TS5A23157RSER, RefDes=RefDes, Type=Type
U2: library part MCP73831T-2ACIOT, "Description", Manufacturer_Name=Microchip, Copyright="Copyright (C) 2026 Ultra Librarian. All rights reserved.", Manufacturer_Part_Number=MCP73831T-2ACI/OT, RefDes=RefDes, Type=Type
U3: "MPU-9250 series Accelerometer, Gyroscope, Humidity, Magnetometer, Pressure, Temperature Sensor Evaluation Board", Package="TFQFN-24 TDK InvenSense", Check_prices=https://www.snapeda.com/parts/MPU-9250/TDK+InvenSense/view-part/?ref=eda, MF="TDK InvenSense", MP=MPU-9250, SnapEDA_Link=https://www.snapeda.com/parts/MPU-9250/TDK+InvenSense/view-part/?ref=snap
U4: "This WiFi module has a 32-bit MCU micro and clock speeds supporting 80 MHz or 160 MHz. Supports the RTOS and integrated Wi-Fi MAC/BB/RF/PA/LNA, and has an on-board antenna.", Package=None, Availability="Not in stock", Check_prices=https://www.snapeda.com/parts/ESP8266-12E/ESP-12E/AI-Thinker/view-part/?ref=eda, MF=AI-Thinker, MP=ESP8266-12E/ESP-12E, Price=None, SnapEDA_Link=https://www.snapeda.com/parts/ESP8266-12E/ESP-12E/AI-Thinker/view-part/?ref=snap
U5: "2-A, high-efficient, 11-ÂµA quiescent current buck-boost converter in QFN/DFN package 10-VSON-HR -40 to 125", Manufacturer_Name="Texas Instruments", Copyright="Copyright (C) 2025 Ultra Librarian. All rights reserved.", Manufacturer_Part_Number=TPS63802DLAR, RefDes=RefDes, Type=TYPE
U6: "USB to serial chip CH340", Package=None, Availability="Not in stock", Check_prices=https://www.snapeda.com/parts/CH340C/WCH/view-part/?ref=eda, MF=WCH, MP=CH340C, Price=None, SnapEDA_Link=https://www.snapeda.com/parts/CH340C/WCH/view-part/?ref=snap
U7: "Description", Manufacturer_Name="CTS Components", Copyright="Copyright (C) 2025 Ultra Librarian. All rights reserved.", Manufacturer_Part_Number=625L3C040M00000, RefDes=RefDes, Type=Type

## Via types
v1: diameter 0.5, hole 0.3, Top Layer to Bottom Layer, 81 vias
v2: diameter 0.5, hole 0.3, Top Layer to Bottom Layer, tented both sides, 1 vias

## Nets (pads, with @x,y where several pads share a name; then routed paths per layer and width w, separated by ;. In a path a pad name is that pad's centre, name@x,y a point inside that pad or via, vN(x,y) a via of type N, cw(c..) or ccw(c..) an arc to the next point about the centre after c; other vN are vias at no path point)
3.3v: B1.7 C14.2 C15.2 C17.2 C27.2 C28.2 C30.1 C31.2 C32.2 C35.1 C36.1 C50.1 R1.1 R2.1 R16.1 R17.1 R18.1 R20.2 R25.2 R27.2 R28.1 R35.1 R36.1 U1.8 U3.1 U3.8 U3.13 U4.8 U5.6 U6.4 U6.16 U7.1 U7.4 | length 253.3
  Top Layer w0.254: R36.1@4.758,8.636 4.877,8.755 v1(4.877,9.982) 4.877,11.193 4.885,11.201 4.885,16.259 6.406,17.78 C15.2@6.531,17.78 6.531,19.376 5.796,20.11 5.796,22.803 6.641,23.647 8.382,23.647 9.013,23.016 9.298,23.016 C14.2@9.449,22.865 ; R18.1@6.909,20.87 7.161,21.122 7.783,21.122 9.449,22.788 C14.2@9.449,22.865 ; v1(10.148,2.518) 10.214,2.518 10.586,2.146 R25.2@11.278,2.146 ; U3.1@12.831,21.117 12.818,21.104 12.413,21.104 11.96,20.651 11.96,20.189 v1(11.913,20.142) 11.916,20.138 11.916,19.87 11.913,19.867 11.913,19.23 13.168,17.975 13.376,17.975 ; R17.1@13.733,24.155 11.913,24.155 v1@11.248,23.491 ; R16.1@13.758,16.739 13.758,17.593 13.376,17.975 ; U3.8@13.776,18.572 13.776,18.166 13.585,17.975 13.376,17.975 ; C50.1@13.919,28.599 14.082,28.599 14.48,28.997 14.48,29.16 15.223,29.904 15.223,32.142 15.773,32.692 16.539,32.692 16.688,32.543 C27.2@16.688,32.029 16.688,31.454 16.597,31.363 16.597,30.257 17.455,29.399 17.7,29.399 v1(17.747,29.352) ; U3.13@15.921,19.117 15.934,19.13 16.34,19.13 16.518,19.308 16.518,20.193 16.742,20.417 16.742,20.933 v1(16.789,20.98) ; C35.1@17.311,2.743 17.409,2.842 17.409,3.258 17.851,3.699 18.863,3.699 19.304,4.14 19.304,4.959 18.149,6.115 17.88,6.115 17.628,6.367 17.628,6.413 18.593,7.379 18.593,10.726 18.466,10.853 18.466,11.446 v1(18.428,11.484) ; 17.35,29.217 17.25,29.117 17.25,28.576 17.148,28.473 17.296,28.325 17.296,27.996 17.369,27.923 17.369,27.305 17.343,27.28 17.294,27.23 17.294,26.187 17.268,26.162 17.343,26.162 18.209,25.296 18.209,25.24 ; v1@17.747,29.278 17.747,28.252 18.04,27.958 18.04,27.227 18.602,26.665 18.738,26.665 19.317,26.086 20.422,26.086 20.917,26.581 20.917,26.962 U7.1@21.107,27.153 ; R1.1@18.339,22.473 18.339,22.984 18.536,23.181 18.536,23.545 18.613,23.623 18.613,24.734 18.664,24.785 ; U7.4@21.107,25.171 21.107,24.994 20.513,24.399 19.151,24.399 18.765,24.785 18.664,24.785 ; v1(21.514,21.623) 21.537,21.6 22.401,21.6 23.387,20.614 23.387,19.297 C36.1@23.369,19.279 ; B1.7@22.676,31.238 22.699,31.261 23.166,31.261 23.52,31.615 v1(23.52,32.563) 24.517,32.563 24.892,32.938 24.892,33.354 25.041,33.503 30.196,33.503 30.577,33.122 32.162,33.122 33.356,31.928 33.48,31.928 C31.2@33.505,31.902 33.505,31.392 33.78,31.117 33.814,31.117 34.089,30.842 34.089,30.447 U1.8@34.091,30.445 ; v1(25.552,21.692) 26.762,21.692 27.928,22.858 33.272,22.858 34.053,22.077 34.053,21.281 33.91,21.138 33.91,19.145 33.015,18.25 32.592,18.25 31.521,17.179 31.521,12.9 31.738,12.683 32.521,12.683 33.063,12.141 U6.4@33.408,12.141 33.753,12.141 34.9,10.994 34.9,9.782 34.036,8.918 32.683,8.918 32.096,8.331 U6.16@27.908,8.331 ; v1(39.548,3.302) 40.826,3.302 41.461,3.937 41.888,3.937 42.037,3.788 42.037,0.936 41.888,0.787 R27.2@41.396,0.787 ; C14.2@9.449,22.865 10.622,22.865 v1(11.201,23.444) v1@11.248,23.491 ; v1@11.248,23.491 11.248,23.948 12.118,24.818 14.863,24.818 14.884,24.839 15.742,24.839 15.79,24.887 17.76,24.887 18.209,24.438 18.209,25.24 ; 18.209,25.24 18.664,24.785
  GND w0.254: v1(4.877,9.982) 8.407,9.982 v1(8.89,9.5) ; v1(16.789,20.98) 16.789,16.298 18.593,14.495 18.593,13.105 18.428,12.94 v1(18.428,11.484) 22.082,7.83 35.672,7.83 37.933,5.569 37.933,4.079 38.71,3.302 v1(39.548,3.302)
  Power w0.254: v1(11.201,23.444) 11.201,20.853 v1(11.913,20.142) ; v1(21.514,21.623) 21.98,22.089 25.088,22.089 25.486,21.692 v1(25.552,21.692)
  Bottom Layer w0.254: v1(10.148,2.518) 10.148,2.575 10.564,2.991 10.564,3.083 11.005,3.524 11.821,3.524 12.157,3.188 12.792,3.188 U5.6@12.794,3.186 ; U5.6@12.794,2.865 U5.6@12.794,3.186 ; v1(16.789,20.98) 17.777,21.968 17.777,22.494 ; C30.1@17.297,8.395 17.605,8.702 18.136,8.702 18.341,8.907 18.341,10.726 18.428,10.813 v1(18.428,11.484) ; v1(17.747,29.352) 17.794,29.305 17.794,28.804 18.527,28.071 18.963,28.071 19.426,28.534 19.426,28.581 20.036,29.191 21.368,29.191 23.52,31.344 v1(23.52,32.563) ; v1(21.514,21.623) 21.514,21.69 21.369,21.835 21.369,22.15 20.896,22.623 U4.8@20.496,22.623 17.777,22.623 17.777,22.494 ; U5.6@12.794,3.186 12.794,4.372 11.862,5.304 11.862,7.206 11.684,7.384 11.509,7.384 11.284,7.61 11.061,7.61 10.464,8.207 10.464,8.679 9.673,9.47 8.92,9.47 v1(8.89,9.5) 4.064,9.5 2.438,11.125 2.438,13.564 3.404,14.529 3.404,16.383 10.443,23.423 11.18,23.423 v1(11.201,23.444) 16.739,23.444 17.689,22.494 17.777,22.494
Charger: C1.2 SW1.1 U2.3 | length 40.9
  Top Layer w0.254: SW1.1@2.438,20.364 5.035,17.768 5.035,16.98 1.397,13.342 1.397,7.312 1.546,7.163 5.944,7.163 6.274,7.493 6.274,12.082 7.61,13.418 7.61,13.969 6.941,13.969 v2(5.797,15.113) ; v2@5.794,15.116 v2@5.8,15.116 ; v1@12.78,9.242 v1(12.827,9.195) 12.874,9.148 12.874,9.037 13.59,8.321 C1.2@13.59,8.153
  GND w0.254: v2(5.797,15.113) 11.029,9.881 12.141,9.881 v1(12.827,9.195)
COM1: B1.13 C4.2 C5.2 C7.2 C38.2 U1.10 | length 25.5
  Top Layer w0.254: B1.13@18.776,31.738 19.051,31.738 19.074,31.761 19.074,32.571 19.126,32.623 v1(19.126,32.69) ; C4.2@24.089,26.213 24.094,26.218 24.094,27.884 C5.2@24.099,27.889 24.225,28.015 24.225,28.484 24.603,28.862 25.747,28.862 C7.2@26.3,29.413 C7.2@26.3,29.413 26.3,31.002 C38.2@25.273,32.029 26.185,32.941 30.186,32.941 32.495,30.632 32.495,30.612 33.138,29.968 33.138,29.766 33.186,29.718 U1.10@33.388,29.718
  Power w0.254: v1(19.126,32.69) 19.126,32.638 19.734,32.029 C38.2@25.273,32.029
COM2: B1.14 C7.1 C8.1 C11.1 C38.1 U1.6 | length 35.4
  Top Layer w0.254: v1(18.226,32.268) 18.226,32.201 18.074,32.05 18.074,31.473 18.287,31.261 18.753,31.261 B1.14@18.776,31.238 ; v1(26.848,28.245) 26.848,28.311 27.203,28.667 C7.1@27.203,29.413 ; C38.1@27.813,32.029 27.203,31.42 C7.1@27.203,29.413 ; C11.1@28.255,26.137 C8.1@28.255,27.864 28.03,28.088 28.03,28.588 27.205,29.413 C7.1@27.203,29.413 ; U1.6@35.091,30.445 35.091,30.357 35.114,30.334 35.622,30.334 36.148,29.807 36.402,29.807 36.469,29.874 36.859,29.874 v1(36.906,29.921)
  Power w0.254: v1(18.226,32.268) 18.226,32.21 19.268,31.167 19.268,31.101 20.264,30.106 24.987,30.106 v1(26.848,28.245) ; C38.1@27.813,32.029 28.321,31.521 28.321,30.785 31.471,27.635 36.424,27.635 36.906,28.118 v1(36.906,29.921)